# Altium PCB DC116A_PCB.PcbDoc (part 4 of 5)
Units mil, origin at the board's own origin, x right, y up, seen from the top; angles counter-clockwise.
Board outline 3300 x 2000 mil, 4 copper layers (Top Layer, GND1, PWR SPLIT PLANE, Bottom Layer), stack 58.64 mil thick; 315 components, 191 nets, 877 pads, 364 vias.
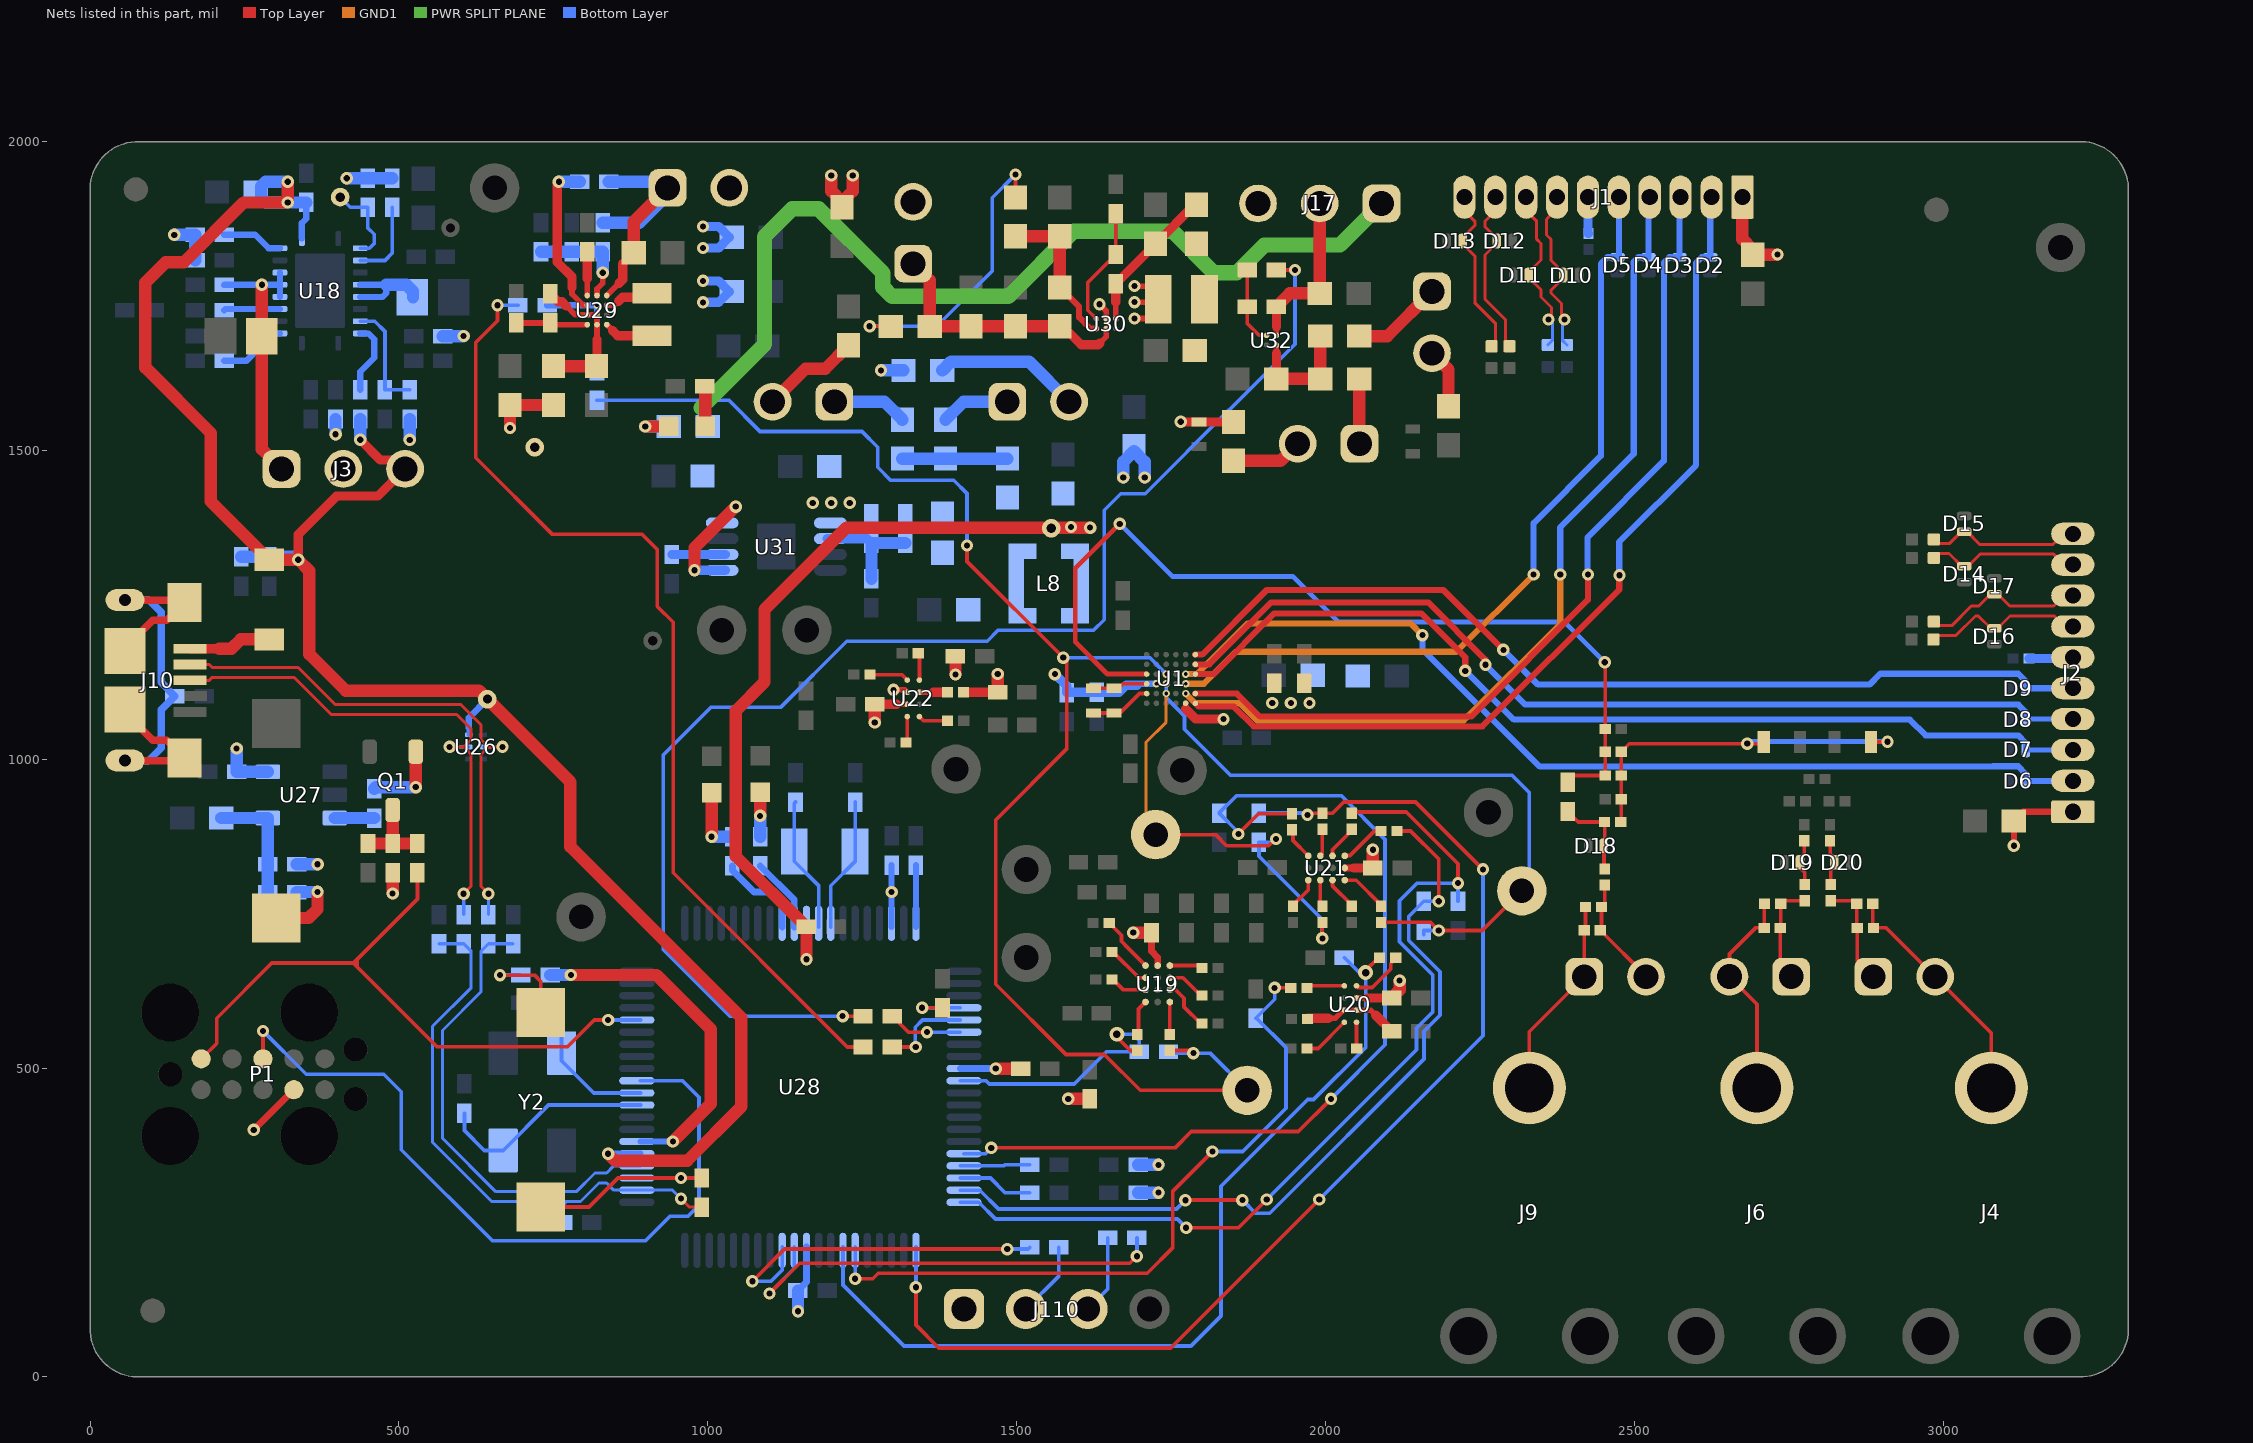
[diagram p5: the nets of this part, all layers, seen from the top]

## Via types
v1: diameter 20, hole 10, Top Layer to Bottom Layer, tented both sides, 316 vias
v2: diameter 19.68, hole 7.87, Top Layer to Bottom Layer, 13 vias
v3: diameter 12, hole 6, Top Layer to GND1, tented both sides, 10 vias
v4: diameter 12, hole 6, Top Layer to Bottom Layer, tented both sides, 8 vias
v5: diameter 30, hole 15, Top Layer to Bottom Layer, tented bottom, 5 vias
v6: diameter 12, hole 6, Top Layer to Bottom Layer, tented bottom, 5 vias
v7: diameter 19.68, hole 7.87, Top Layer to Bottom Layer, tented both sides, 4 vias
v8: diameter 24, hole 12, Top Layer to Bottom Layer, tented both sides, 3 vias

## Nets (pads, with @x,y where several pads share a name; then routed paths per layer and width w, separated by ;. In a path a pad name is that pad's centre, name@x,y a point inside that pad or via, vN(x,y) a via of type N, cw(c..) or ccw(c..) an arc to the next point about the centre after c; other vN are vias at no path point) (continued)
LDO_EN: R97.1 R131.1 | length 2235.2
  Top Layer w6: v1(1218.34,584.17) R97.1@1251.38,584.17 ; R131.1@1920.59,1792.05 v1(1950.79,1792.05)
  Bottom Layer w6: v1(1218.34,584.17) 1035.83,584.17 928.16,691.84 928.16,1006.87 1005.68,1084.39 1118.69,1084.39 1225.2,1190.89 1452.36,1190.89 1470.49,1209.03 1625.03,1209.03 1642,1226 1642,1403.2 1668.76,1429.96 1708.11,1429.96 1843.16,1565.01 1844.08,1565.01 1950.79,1671.72 v1(1950.79,1792.05)
MSP_AVCC: C49.2 C69.1 L8.2 R122.1 U28.11 | length 1267.4
  Top Layer w20: v1(1159.84,676.09) C49.2@1159.84,728.54 1045.38,843 1045.38,1078.33 1092,1124.94 1092,1242.38 1224.62,1375 v1(1619,1375)
  Bottom Layer w10: v1(1159.84,676.09) U28.11@1159.84,728.54
  other v1: 1588,1376
  other v5: 1556,1374
MSP_DVCC: C20.2 C22.1 C24.2 C26.2 C43.2 C50.2 C51.2 C66.1 C67.1 J17.1 J110.1 P1.4 R17.1 R18.1 R19.1 R21.1 R22.1 R23.1 R25.1 R83.2 R91.2 R94.2 R98.2 R99.2 R121.1 R123.2 U19.A2 U20.B2 U21.A2 U22.B2 U27.5 U28.18 U28.50 U31.1 | length 2660.4
  Top Layer w9.05: 1305.53,1088.82 U22.B2@1323.02,1088.82 ; U20.B2@2050.28,613.53 2067.59,613.53
  Top Layer w10.83: C20.2@1718.37,719.39 1718.37,689.37 1728.4,679.34 U19.A2@1728.4,666.01 ; U21.A2@2031.18,823.97 2045.65,823.97
  Top Layer w11: v1(265,400) P1.4@330,465
  Top Layer w15: C26.2@1270.44,1088.82 1305.53,1088.82 ; 2045.65,823.97 C24.2@2076.82,823.97 ; 2067.59,613.53 C22.1@2107.26,613.53
  Top Layer w20: v1@490,782.79 R83.2@490,816.38 ; v1(1270.44,1059.42) C26.2@1270.44,1088.82 ; v1(1583.54,450.17) R94.2@1618.54,450.17 ; v1(1688.97,719.39) C20.2@1718.37,719.39 ; C24.2@2076.82,823.97 v1(2076.82,853.36) ; C22.1@2107.26,613.53 2120.08,626.35 v1(2120.08,641.68)
  PWR SPLIT PLANE w25: 989.62,1569.27 1091.86,1671.5 1091.86,1846.01 1136.7,1890.85 1179.7,1890.85 1283.5,1787.05 1283.5,1764.11 1298.36,1749.25 1486.75,1749.25 1592.57,1855.07 1752.09,1855.07 1819.7,1787.46 1856.13,1787.46 1901.18,1832.51 2023.61,1832.51 J17.1@2090.89,1899.79
  Bottom Layer w10: U28.18@1297.64,728.54 v1(1297.64,785) C50.2@1297.64,828.54
  Bottom Layer w11: C51.2@1146.06,140 1159.84,153.78 U28.50@1159.84,210.83
  Bottom Layer w20: v1(136.41,1848.9) 136.57,1849.06 R19.1@170.16,1849.06 R17.1@170.16,1807.87 ; v1@237.5,1017.33 C43.2@237.5,979.65 U27.5@287.87,979.65 ; R91.2@334.74,829.84 v1@368.33,829.84 ; v1@397.4,1526.06 R23.1@397.4,1550.81 ; v1@415.81,1940.81 R22.1@449.4,1940.81 R21.1@489.4,1940.81 ; v1@517.4,1517.22 R18.1@517.4,1550.81 ; R25.1@571.02,1685 v1@604.62,1685 ; v1@1146.06,106.41 C51.2@1146.06,140 ; R98.2@1696.62,298.35 v1(1729.62,298.35) ; R99.2@1696.62,343.35 v1(1729.62,343.35)
  other v1: 1146.22,106.25 489.84,782.63 368.49,830 237.34,1017.33 1170,1415 1200,1415 1230,1415 517.56,1517.06 397.56,1526.06 604.77,1685.16 415.65,1940.65
MSP_USB_D_N: C38.1 R86.1 U28.64 | length 759.5
  Bottom Layer w5: C38.1@685,701.38 R86.1@645,701.38 633,689.38 633,623.37 570.51,560.88 570.51,386.49 657,300 787.37,300 817.42,330.05 836.32,330.05 848,341.73 U28.64@891.14,341.73
MSP_USB_D_P: C39.1 R85.1 R87.1 R89.1 U28.62 | length 949.8
  Top Layer w4.9: v1(956.65,288.74) 970.59,274.8 R85.1@990.4,274.8
  Bottom Layer w5: C39.1@565,701.38 R87.1@605,701.38 617,689.38 617,630 554.51,567.51 554.51,379.87 650.37,284 765.74,284 ; 758.58,283.93 765,277.5 ; R89.1@765,250 765,277.5 ; v1(956.65,288.74) 943.03,302.36 848,302.36 836.32,314.05 824.05,314.05 794,284 771.96,284 ; 765,277.5 765.06,277.44 765.41,277.44 771.96,284 ; 765,277.5 765,283.26 765.74,284 ; 765.74,284 771.96,284
MSP_USB_N: J10.2 R86.2 U26.2 | length 886.8
  Top Layer w4.9: J10.2@162.4,1153.39 193,1153.39 197.8,1148.6 336.87,1148.6 396.98,1088.48 600.27,1088.48 633,1055.75 633,1032 645,1020 ; v1(644.84,782.37) 632.84,794.37 632.84,1007.84 645,1020 ; v1(667.8,1020) 645,1020
  Bottom Layer w5: U26.2@636.81,1020 v1(667.8,1020) ; R86.2@645,748.62 v1@645,782.21
MSP_USB_P: J10.3 R87.2 U26.5 | length 889.9
  Top Layer w4.9: v1(582.2,1020) 605,1020 ; v1(604.84,782.37) 616.84,794.37 616.84,1008.16 605,1020 ; 193,1127.8 197.8,1132.6 330.24,1132.6 390.36,1072.48 593.64,1072.48 617,1049.12 617,1032 605,1020 ; 193,1127.8 162.82,1127.81 193,1127.8
  Bottom Layer w5: v1(582.2,1020) U26.5@613.19,1020 ; R87.2@605,748.62 v1@605,782.21
NetC2_1: C2.1 C27.1 U1.E1 | length 99.3
  Top Layer w6: C27.1@1624.76,1075 C2.1@1657.76,1075 ; C2.1@1657.76,1074 1666.47,1074 1698.85,1106.38 U1.E1@1710.63,1106.38
NetC2_2: C2.2 C27.2 U1.D1 | length 95.7
  Top Layer w6: C27.2@1624.76,1115 1656.76,1115 C2.2@1657.26,1114.5 ; C2.2@1657.76,1114 C2.2@1664.13,1114 ; C2.2@1657.76,1115 1663.13,1115 C2.2@1664.13,1114 ; U1.D1@1710.63,1122.13 1672.26,1122.13 C2.2@1664.13,1114
NetC13_1: C13.1 C14.2 J3.1 U18.15 U18.16 U18.17 | length 440.8
  Top Layer w20: v1(278.15,1768.03) C13.1@278.15,1684.71 278.15,1501.85 J3.1@310,1470
  Bottom Layer w10: C14.2@217.4,1767.87 217.73,1768.21 U18.16@307.47,1768.21 ; U18.15@307.47,1748.52 U18.16@307.47,1768.21 ; U18.17@307.47,1787.89 U18.16@307.47,1768.21
NetC30_1: C30.1 J5.1 R3.1 R5.2 | length 173.2
  Top Layer w6: R3.1@2818,771.02 2854.96,771.02 R5.2@2860.01,765.97 2860.01,728.02 C30.1@2861.02,727.02 2861.02,674 J5.1@2887,648.02
NetC30_2: C30.2 J4.1 J5.2 R5.1 | length 390
  Top Layer w6: R5.1@2885.99,765.97 2885.99,728.02 C30.2@2887,727.02 2908,727.02 J5.2@2987,648.02 3078,557.02 J4.1@3078,467.79
NetC33_1: C33.1 J7.1 R8.1 R12.2 | length 166.6
  Top Layer w6: J7.1@2754,648.05 2736.4,665.65 R12.2@2736.4,727.02 2736.98,727.6 C33.1@2736.98,765.97 2742.03,771.02 R8.1@2776,771.02
NetC33_2: C33.2 J6.1 J7.2 R12.1 | length 348.5
  Top Layer w6: J6.1@2698.5,467.79 2698.5,603.54 J7.2@2654,648.05 2654,684.74 2696.27,727.02 R12.1@2710.41,727.02 2710.41,765.38 C33.2@2711,765.97
NetC35_2: C35.2 C77.1 R6.1 R7.2 R70.2 R71.1 | length 606.9
  Top Layer w6: R70.2@2477.98,898.25 2478.87,899.13 C77.1@2478.87,935.25 2478.93,935.31 C35.2@2478.93,973.65 R71.1@2478.93,1012.25 2491.92,1025.24 v1(2683,1025.24) 2706.71,1025.24 R7.2@2709.47,1028 ; R6.1@2883.06,1028 2909.63,1028 v1(2910,1028.37)
  Bottom Layer w8: v1(2683,1025.24) 2686.14,1028.37 v1(2910,1028.37)
NetC36_1: C36.1 J8.2 R72.2 R73.1 | length 182.1
  Top Layer w6: R73.1@2452,796.54 2452,766.01 R72.2@2446.99,761 2446.99,725 C36.1@2444.99,723 2519,648.99 J8.2@2519,647.98
NetC36_2: C36.2 J8.1 J9.1 R72.1 | length 336
  Top Layer w6: J9.1@2330,467.79 2330,558.98 J8.1@2419,647.98 C36.2@2419.01,723 2421.01,725 R72.1@2421.01,761
  Top Layer w8.5: J9.1@2326.38,460.2 J9.1@2330,456.57
NetC37_1: C37.1 Q1.3 R83.1 R84.1 | length 134.1
  Top Layer w20: C37.1@450,863.62 R83.1@490,863.62 ; Q1.3@490,917.76 R83.1@490,863.62 ; R84.1@530,863.62 R83.1@490,863.62
NetC42_1: C42.1 R91.1 R92.2 U27.4 | length 195.5
  Bottom Layer w20: C42.1@212.5,904.84 U27.4@287.87,904.84 287.87,830.21 R91.1@287.5,829.84 R92.2@287.5,784.84
NetC47_1: C47.1 U28.20 | length 100
  Bottom Layer w10: U28.20@1337.01,728.54 C47.1@1337.01,828.54
NetC53_1: C53.1 R106.1 R108.1 U29.A2 U29.B2 U29.B3 | length 243.1
  Top Layer w9: 771.12,1733.59 785.45,1719.25 U29.B3@805,1719.25 U29.B2@820.75,1719.25 U29.A2@820.75,1703.5 820.75,1679.55
  Top Layer w15: R108.1@745,1753.62 757.98,1740.64 764.07,1740.64 771.12,1733.59 ; C53.1@820,1636.5 820.75,1637.24 820.75,1679.55
  Top Layer w20: R106.1@750,1636.5 C53.1@820,1636.5
NetC54_1: C54.1 J12.1 R109.2 R110.2 U29.D1 | length 448.8
  Top Layer w9: U29.D1@836.5,1750.75 856.37,1770.62
  Top Layer w15: 856.37,1770.62 862.26,1776.51 862.26,1802.26 C54.1@880,1820
  Top Layer w20: C54.1@880,1820 880,1870 J12.1@935,1925
  Bottom Layer w20: R109.2@830,1868.62 889.36,1868.62 935,1914.26 J12.1@935,1925 925,1935 R110.2@840,1935
NetC58_1: C58.1 R107.2 R111.2 U30.A1 | length 240.7
  Top Layer w9.05: U30.A1@1660.67,1713.03 1660.67,1740.12
  Top Layer w15: 1660.67,1740.12 R111.2@1660.67,1769.88 1725.17,1834.38 C58.1@1725.17,1834.54 1788.16,1897.53 R107.2@1791.58,1897.53
NetC59_1: C59.1 C60.1 C63.1 J13.1 R112.2 U30.B2 | length 424.1
  Top Layer w9.05: 1634.52,1673.46 1644.92,1683.86 U30.B2@1644.92,1697.28
  Top Layer w15: C63.1@1574.95,1700.84 1604.59,1671.2 1632.27,1671.2 1634.52,1673.46
  Top Layer w20: J13.1@1332.51,1802.29 1359.27,1775.53 R112.2@1359.27,1700.84 C60.1@1426.51,1700.84 C59.1@1498.23,1700.84 C63.1@1569.95,1700.84
NetC62_1: C62.1 R109.1 R114.2 U29.D2 | length 174.4
  Top Layer w9: U29.D2@820.75,1750.75 820.75,1761.38 830.16,1770.79 v1(830.16,1787.63)
  Bottom Layer w20: R114.2@730,1821.38 C62.1@780,1821.38 R109.1@830,1821.38 v1@830,1787.79
NetC63_2: C63.2 R117.1 R119.2 U30.C2 | length 251
  Top Layer w10: C63.2@1569.95,1763.84 1601.3,1732.49 1601.3,1715.44 1619.45,1697.28 U30.C2@1629.17,1697.28
  Top Layer w20: R117.1@1498.23,1846.5 R119.2@1569.89,1846.51 C63.2@1569.89,1763.9
NetC64_1: C64.1 U29.D3 | length 70.6
  Top Layer w9: U29.D3@805,1750.75 805,1778.13
  Top Layer w15: 805,1778.13 C64.1@805,1821.38
NetC66_2: C66.2 R123.1 R126.1 U31.2 | length 187
  Bottom Layer w15: U31.2@1193.68,1357.04 1257.96,1357.04 C66.2@1265,1350
  Bottom Layer w20: R126.1@1265,1292.24 C66.2@1265,1350 R123.1@1320,1350
NetC68_1: C68.1 L8.1 R121.2
NetC72_1: C72.1 U31.6 | length 86.3
  Bottom Layer w15: C72.1@942,1331.45 U31.6@1028.32,1331.45
NetC74_1: C74.1 J17.2 R130.2 U32.A2 | length 271.1
  Top Layer w9.05: U32.A2@1920.59,1686.28 1920.59,1700.03
  Top Layer w15: 1920.59,1700.03 R130.2@1920.59,1732.56
  Top Layer w20: R130.2@1920.59,1732.56 1942.3,1754.28 C74.1@1990.89,1754.28 J17.2@1990.89,1899.79
NetC75_1: C75.1 R128.1 R129.1 U32.B2 | length 195
  Top Layer w9.05: 1920.59,1657.43 U32.B2@1920.59,1670.53
  Top Layer w15: C75.1@1920.59,1615.7 1920.59,1657.43
  Top Layer w20: C75.1@1920.59,1615.7 R129.1@1991.51,1615.7 ; R129.1@1991.57,1615.63 R128.1@1991.57,1684.87
NetD18_1: D18.1 R70.1 R73.2 R74.1 | length 143.8
  Top Layer w6: R74.1@2392,915.38 2409.13,898.25 R70.1@2452,898.25 2452,861.19 D18.1@2450.8,859.99 2450.8,823.73 R73.2@2452,822.52
NetD19_1: D19.1 R8.2 R10.1 | length 77
  Top Layer w6: R10.1@2775,868 2775,846.71 2768.26,839.97 D19.1@2768.26,832.93 2768.26,824.28 2776,816.55 R8.2@2776,797
NetD20_1: D20.1 R3.2 R4.1 | length 77.5
  Top Layer w6: R3.2@2817,798 R3.2@2818,797 2818,820.3 2823.7,826 D20.1@2823.7,832.93 2823.7,840.01 2817,846.71 R4.1@2817,868
NetJ1_6: J1.6 R1.1 | length 59.4
  Bottom Layer w15: J1.6@2425,1910 2425,1851.99 R1.1@2426,1850.99
NetJ2_6: J2.6 R2.1 | length 71.8
  Bottom Layer w15: R2.1@3138.99,1163 3208,1163 J2.6@3210,1165
NetJ10_6: J10.6 J10.7 J10.8 J10.9 J10.10 J10.11 R88.2 | length 831.3
  Top Layer w12: J10.7@56.67,997.88 149.19,997.88 J10.9@153.12,1001.82 124.25,1030.69 101.83,1030.69 56.67,1075.85 J10.11@56.67,1080.56 ; J10.10@56.67,1175.05 56.67,1179.75 101.83,1224.92 124.25,1224.92 J10.8@153.12,1253.79 149.19,1257.72 J10.6@56.67,1257.72
  Bottom Layer w12: J10.7@56.67,997.88 94.67,997.88 115,1018.21 115,1079.83 R88.2@137.38,1102.21 115,1124.59 115,1237.8 95.08,1257.72 J10.6@56.67,1257.72
NetJ11_1: J11.1 R129.2 | length 104.3
  Top Layer w20: J11.1@2054.57,1511.29 R129.2@2054.57,1615.63
NetJ11_2: J11.2 L11.1 | length 115.5
  Top Layer w20: L11.1@1851.03,1483.02 1927.15,1483.02 J11.2@1954.99,1510.87
NetJ14_1: J14.1 R120.2 | length 122
  Bottom Layer w20: J14.1@1205,1578.74 1285.98,1578.74 R120.2@1315,1549.72
NetJ14_2: J14.2 L7.1 | length 161
  Top Layer w20: J14.2@1105,1578.74 1158.35,1632.09 1190.15,1632.09 L7.1@1228.15,1670.09
NetJ15_1: J15.1 R125.2 | length 112
  Bottom Layer w20: R125.2@1385,1549.72 1414.02,1578.74 J15.1@1485,1578.74
NetJ15_2: J15.2 L9.1 | length 238
  Bottom Layer w20: L9.1@1379.86,1629.49 1394.11,1643.74 1520,1643.74 J15.2@1585,1578.74
NetJ16_1: J16.1 R128.2 | length 148.1
  Top Layer w20: R128.2@2054.57,1684.87 2100.12,1684.87 J16.1@2172.6,1757.35
NetJ16_2: J16.2 L10.1 | length 96.9
  Top Layer w20: J16.2@2172.6,1657.35 2199.11,1630.84 2199.11,1571.61 L10.1@2199,1571.5
NetJ110_2: J110.2 R103.2 | length 121.9
  Bottom Layer w6: J110.2@1515,110 1568.46,163.46 R103.2@1568.46,209.73
NetJ110_3: J110.3 R102.2 | length 129
  Bottom Layer w6: J110.3@1615,110 1647.52,142.52 R102.2@1647.52,225.54
NetL5_1: L5.1 U29.A1 | length 80.9
  Top Layer w9: U29.A1@836.5,1703.5 846.34,1693.66
  Top Layer w15: 846.34,1693.66 854.45,1685.55 L5.1@910,1685.55
NetL5_2: L5.2 U29.C1 | length 81.6
  Top Layer w9: U29.C1@836.5,1735 849.13,1735 855.52,1741.4
  Top Layer w15: 855.52,1741.4 861.94,1747.82 903.37,1747.82 L5.2@910,1754.45
NetL6_2: L6.2 U30.B1 | length 188.1
  Top Layer w9.05: v1(1634.3,1736.64) 1644.92,1726.02 U30.B1@1644.92,1713.03 ; v1(1690.92,1713.53) 1720.49,1713.53 1729.53,1722.56 L6.2@1729.53,1744.51 ; v1(1690.92,1739.97) 1724.99,1739.97 L6.2@1729.53,1744.51 ; v1(1690.92,1766.02) 1721.34,1766.02 1729.53,1757.84 L6.2@1729.53,1744.51
NetLED1_1: LED1.1 R104.1 | length 104.6
  Top Layer w20: v1(1006.25,874.46) LED1.1@1006.25,945.47
  Bottom Layer w20: v1@1006.41,874.62 R104.1@1040,874.62
NetLED2_1: LED2.1 R105.1 | length 71.6
  Top Layer w20: v1(1084.84,908.37) LED2.1@1084.84,946.36
  Bottom Layer w20: R105.1@1085,874.62 v1@1085,908.21
NetLED3_2: LED3.2 R127.1 | length 65.4
  Top Layer w20: R127.1@995,1603.74 996.06,1602.68 LED3.2@996.06,1538.74
NetQ1_1: Q1.1 R90.2 | length 125.9
  Top Layer w20: v1(527.4,954.87) Q1.1@527.4,1012.24
  Bottom Layer w20: R90.2@460,952.09 462.79,954.87 v1(527.4,954.87)
NetR13_1: R13.1 U18.14 | length 90.8
  Bottom Layer w10: R13.1@217.4,1727 219.24,1728.84 U18.14@307.47,1728.84
NetR27_2: R27.2 U19.A3 | length 51.5
  Top Layer w6: U19.A3@1748.08,666.01 1794.04,666.01 R27.2@1797.97,662.08
NetR28_1: R28.1 U19.A1 | length 93.4
  Top Layer w6: R28.1@1649.87,734.88 1650.12,734.88 1669.97,715.03 1669.97,705.22 1676.27,698.92 1676.27,698.45 U19.A1@1708.71,666.01
NetR29_2: R29.2 U19.B3 | length 61.8
  Top Layer w6: U19.B3@1748.08,646.33 1769.22,646.33 R29.2@1797.97,617.57
NetR30_1: R30.1 U19.B1 | length 69.8
  Top Layer w6: R30.1@1656.25,688.15 1698.07,646.33 U19.B1@1708.71,646.33
NetR31_2: R31.2 U19.C3 | length 80.7
  Top Layer w6: U19.C3@1748.08,626.64 1757.74,626.64 1771.17,613.22 1771.17,599.08 R31.2@1797.98,572.26
NetR32_1: R32.1 U19.C1 | length 59.4
  Top Layer w6: R32.1@1656.25,643.4 1673,626.64 U19.C1@1708.71,626.64
NetR33_2: R33.2 U19.D3 | length 50.5
  Top Layer w6: R33.2@1748.08,556.48 U19.D3@1748.08,606.96
NetR34_1: R34.1 U19.D1 | length 57.8
  Top Layer w6: R34.1@1697.36,553.87 1697.36,595.6 U19.D1@1708.71,606.96
NetR37_1: R37.1 U20.A2 | length 91.5
  Top Layer w6: U20.A2@2050.28,633.22 2052.98,630.52 2075.93,630.52 2105.74,660.33 2105.74,668.9 R37.1@2115.64,678.79
NetR40_2: R40.2 U20.A1 | length 60
  Top Layer w6: R40.2@1971.93,629.88 1975.27,633.22 U20.A1@2030.59,633.22
NetR42_2: R42.2 R43.2 U20.C1 U20.C2 | length 154.8
  Top Layer w9.05: 2004.54,580.83 2015.97,580.83 2028.99,593.85 U20.C1@2030.59,593.85 U20.C2@2050.28,593.85 2073.2,593.85 2081.07,585.97
  Top Layer w15: R43.2@1971.93,580.83 2004.54,580.83 ; 2081.07,585.97 R42.2@2107.26,559.79
NetR44_2: R44.2 U20.D1 | length 76.2
  Top Layer w6: R44.2@1971.93,531.78 1988.21,531.78 U20.D1@2030.59,574.16
NetR45_1: R45.1 U20.D2 | length 43.4
  Top Layer w6: U20.D2@2050.28,574.16 2050.28,534.26 R45.1@2052.77,531.78
NetR46_2: R46.2 U21.A3 | length 75.7
  Top Layer w6: U21.A3@2031.18,804.28 2049.7,804.28 R46.2@2090.1,763.89
NetR47_1: R47.1 U21.A1 | length 76
  Top Layer w6: U21.A1@2031.18,843.65 2031.18,844.2 2039.75,844.2 2079.55,884 R47.1@2090.01,884 ; R47.1@2090.01,884.62 R47.1@2090.1,884.62
NetR48_2: R48.2 U21.B3 | length 53.3
  Top Layer w6: U21.B3@2011.49,804.28 2011.49,794.97 R48.2@2042.58,763.89
NetR49_1: R49.1 U21.B1 | length 53.8
  Top Layer w6: U21.B1@2011.49,843.65 2011.49,853.54 R49.1@2042.58,884.62
NetR50_2: R50.2 U21.C3 | length 41.7
  Top Layer w6: U21.C3@1991.81,804.28 1991.81,767.13 R50.2@1995.05,763.89
NetR51_1: R51.1 U21.C1 | length 42.3
  Top Layer w6: U21.C1@1991.81,843.65 1995.05,846.9 R51.1@1995.05,884.62
NetR52_2: R52.2 U21.D3 | length 50.6
  Top Layer w6: R52.2@1947.53,763.89 1972.12,788.48 U21.D3@1972.12,804.28
NetR53_1: R53.1 U21.D1 | length 51.2
  Top Layer w6: R53.1@1947.53,884.62 1947.53,868.25 U21.D1@1972.12,843.65
NetR62_1: R62.1 U22.A2 | length 42.2
  Top Layer w6: R62.1@1323.02,1026.96 U22.A2@1323.02,1069.13
NetR63_2: R63.2 U22.D2 | length 62.2
  Top Layer w6: R63.2@1264.44,1136.99 1314.22,1136.99 U22.D2@1323.02,1128.19
NetR64_1: R64.1 U22.A1 | length 46.4
  Top Layer w6: U22.A1@1342.71,1069.13 1349.42,1062.43 R64.1@1386.38,1062.43
NetR65_2: R65.2 U22.D1 | length 43.3
  Top Layer w6: U22.D1@1342.71,1128.19 R65.2@1342.71,1171.52
NetR66_1: R66.1 U22.C1 | length 43.6
  Top Layer w9.05: U22.C1@1342.71,1108.5 1365.39,1108.5
  Top Layer w15: 1365.39,1108.5 R66.1@1386.35,1108.5
NetR82_2: R82.2 S1.2 | length 154
  Top Layer w6: v1(663.77,650.52) 719.48,650.52 729.76,640.24 S1.2@729.76,590.06
  Bottom Layer w6: v1@663.93,650.68 R82.2@697.52,650.68
NetR90_1: R90.1 U27.3 | length 63.9
  Bottom Layer w20: U27.3@396.13,904.84 R90.1@460,904.84
NetR92_1: R92.1 S2.1 | length 134.4
  Top Layer w20: S2.1@301.36,742.9 353.93,742.9 368.24,757.21 v1(368.24,785.27)
  Bottom Layer w20: R92.1@334.74,784.84 v1(368.24,785.27)
NetR100_1: R100.1 U28.37 | length 113.2
  Bottom Layer w6: U28.37@1408.86,341.73 1479.73,341.73 1481.35,343.35 R100.1@1521.38,343.35
NetR101_1: R101.1 U28.38 | length 122.3
  Bottom Layer w6: U28.38@1408.86,322.05 1457.65,322.05 1481.35,298.35 R101.1@1521.38,298.35
NetR104_2: R104.2 U28.9 | length 146.8
  Bottom Layer w11: R104.2@1040,827.38 1040,820 1075,785 1100,785 1120.47,764.53 U28.9@1120.47,728.54
NetR105_2: R105.2 U28.10 | length 121.7
  Bottom Layer w11: R105.2@1085,827.38 1140.16,772.22 U28.10@1140.16,728.54
NetR108_2: R108.2 R113.2 U29.A3 | length 116.2
  Top Layer w9: R108.2@745,1706.38 747.87,1703.5 U29.A3@805,1703.5
  Top Layer w10: R113.2@690,1706.38 R108.2@745,1706.38
NetR110_1: R110.1 U29.C3 | length 258.6
  Top Layer w9: 780.21,1763.72 780.21,1753.15 798.36,1735 U29.C3@805,1735
  Top Layer w15: v1(759.01,1934.84) 756.34,1932.18 756.34,1804.82 780.21,1780.95 780.21,1763.72
  Bottom Layer w20: v1@759.17,1935 R110.1@792.76,1935
NetR111_1: R111.1 R115.2 U30.C1 | length 194.8
  Top Layer w6: U30.C1@1629.17,1713.03 1615.3,1726.91 1615.3,1771.75 R111.1@1660.67,1817.12 R115.2@1660.67,1883.28
NetR112_1: R112.1 R117.2 | length 483.8
  Top Layer w6: v1(1262.08,1700.84) R112.1@1296.28,1700.84 ; R117.2@1498.23,1909.5 v1(1498.23,1946.7)
  Bottom Layer w6: v1(1262.08,1700.84) 1370.9,1700.84 1460.47,1790.41 1460.47,1908.93 v1(1498.23,1946.7) v1@1503.23,1946.7
NetR116_2: R116.2 R118.2 U29.C2 | length 187.1
  Bottom Layer w10: R118.2@740,1735 v6(820.75,1735) R116.2@820.75,1628.62
NetR120_1: R120.1 R122.2 R125.1 | length 170
  Bottom Layer w20: R120.1@1315,1486.73 R125.1@1385,1486.73 R122.2@1485,1486.73
NetR130_1: R130.1 R131.2 U32.A1 | length 126
  Top Layer w6: R131.2@1873.34,1792.05 R130.1@1873.34,1732.56 1873.34,1705.55 1892.61,1686.28 U32.A1@1904.84,1686.28
P1.3: R93.2 U28.24 | length 94.9
  Top Layer w6: v1(1347,597.64) R93.2@1380,597.64
  Bottom Layer w6: v1(1347,597.64) U28.24@1408.86,597.64
P1.4: R95.2 U28.25 | length 148
  Top Layer w6: R95.2@1298.62,534.17 v1(1336.62,534.18)
  Bottom Layer w6: v1(1336.62,534.18) 1336,534.8 1336,566.14 1347.82,577.95 U28.25@1408.86,577.95
P1.5: R97.2 U28.26 | length 121
  Top Layer w6: R97.2@1298.62,584.17 1324.53,558.27 v1(1355,558.27)
  Bottom Layer w6: v1(1355,558.27) U28.26@1408.86,558.27
P2.0: R96.2 U28.29 | length 97.5
  Top Layer w20: v1(1466.35,499.21) R96.2@1506.38,499.21
  Bottom Layer w11: U28.29@1408.86,499.21 v1(1466.35,499.21)
PACK_P: C18.1 U18.5 U18.6 | length 157.4
  Bottom Layer w10: U18.6@437.39,1748.52 473.52,1748.52 479.66,1754.66 479.66,1768.03 U18.5@437.39,1768.03
  Bottom Layer w20: 479.66,1768.03 512.31,1768.03 522.94,1757.4 C18.1@522.94,1748.19
PD1_N: D11.1 J1.8 L12.2 | length 280.6
  Top Layer w4.9: J1.8@2325,1910 2325,1887.98 2342,1870.98 2342,1842 2348.99,1835.01 2348.99,1808.17 2329.24,1788.43 D11.1@2329.24,1783.88 2329.24,1779.62 2348.99,1759.87 2348.99,1748.19 2366,1731.19 2366,1716.99 v1(2361.01,1712)
  Bottom Layer w5: L12.2@2360,1670.56 2367.5,1678.06 2367.5,1705.51 v1(2361.01,1712)
PD1_P: D10.1 J1.7 L14.2 | length 279.5
  Top Layer w4.9: J1.7@2375,1910 2375,1891 2358,1874 2358,1848.63 2364.99,1841.64 2364.99,1807.64 2384.9,1787.73 D10.1@2384.9,1783.88 2384.9,1779.28 2364.99,1759.37 2364.99,1754.82 2382,1737.81 2382,1716.99 v1(2386.99,1712)
  Bottom Layer w5: v1(2386.99,1712) 2383.5,1708.51 2383.5,1678.12 L14.2@2391,1670.62
PD2_N: D13.1 J1.10 L1.2 | length 281.9
  Top Layer w4.9: J1.10@2225,1910 2225,1887.3 2242.3,1870 2242.3,1864.79 2221.95,1844.45 D13.1@2221.95,1839 2221.95,1834.21 2242.3,1813.87 2242.3,1738.23 2275.5,1705.03 2275.5,1675.09 L1.2@2269,1668.59
PD2_P: D12.1 J1.9 L3.2 | length 280.7
  Top Layer w4.9: J1.9@2275,1910 2275,1887.7 2258.3,1871 2258.3,1862.08 2277.54,1842.83 D12.1@2277.54,1839 2277.54,1835.63 2258.3,1816.38 2258.3,1744.86 2291.5,1711.65 2291.5,1675.09 L3.2@2298,1668.59
PD3_N: D15.1 J2.10 L2.2 | length 251.4
  Top Layer w4.9: L2.2@2984.89,1356 2991.89,1349 3010,1349 3029.2,1368.2 D15.1@3034,1368.2 3038.81,1368.2 3059.01,1348 3178,1348 3195,1365 J2.10@3210,1365
PD3_P: D14.1 J2.9 L4.2 | length 251.7
  Top Layer w4.9: L4.2@2984.89,1326 2991.89,1333 3009.32,1333 3029.89,1312.43 D14.1@3034,1312.43 3040.12,1312.43 3059.69,1332 3179,1332 3196,1315 J2.9@3210,1315
PD4_N: D17.1 J2.8 L13.2 | length 264.7
  Top Layer w4.9: L13.2@2984.89,1222.75 2991.39,1216.25 3013.94,1216.25 3045.7,1248 3057.76,1248 3077.97,1268.2 3083,1268.2 3087.68,1268.2 3107.89,1248 3179,1248 3196,1265 J2.8@3210,1265
PD4_P: D16.1 J2.7 L15.2 | length 266.1
  Top Layer w4.9: L15.2@2984.29,1193.75 2990.79,1200.25 3020.57,1200.25 3052.32,1232 3057,1232 3078.18,1210.82 3083,1210.82 3087.06,1210.82 3108.24,1232 3180,1232 3197,1215 J2.7@3210,1215
PFM/PWM_CTRL: R95.1 R118.1 | length 1607.9
  Top Layer w6: v1(659.76,1735) 659.76,1709.97 624.54,1674.75 624.54,1488.25 748.77,1364.02 893.86,1364.02 918.27,1339.61 918.27,1247.47 944,1221.74 944,816.2 1226.03,534.17 R95.1@1251.38,534.17
  Bottom Layer w6: v1(659.76,1735) R118.1@692.76,1735
POW_CE: R15.2 U18.9 | length 117.8
  Bottom Layer w10: R15.2@437.4,1598.05 437.4,1627.4 460,1650 460,1680 450.53,1689.47 U18.9@437.39,1689.47
PROG_OUT1: R33.1 R41.2 R116.1 TP7.1 U1.C3 | length 2438.3
  Top Layer w6: v1(1419.74,1346.12) 1419.74,1320.26 v1(1575.47,1164.53) 1580.99,1159.01 1580.99,1016.4 1466.38,901.78 1466.38,635.85 1580.07,522.16 1642.06,522.16 1700.22,464 TP7.1@1873.34,464 ; R33.1@1748.08,528.52 1781.88,528.52 v1(1786.18,524.23)
  Bottom Layer w6: R116.1@820.75,1581.38 1033.93,1581.38 1084.67,1530.64 1249.66,1530.64 1275.21,1505.09 1275.21,1472.58 1296,1451.8 1398.2,1451.8 1419.74,1430.26 v1(1419.74,1346.12) ; v1(1575.47,1164.53) 1715.41,1164.53 v4(1742.13,1137.87) ; R41.2@1745.94,526.56 1748.27,524.23 v1(1786.18,524.23) 1813.12,524.23 TP7.1@1873.34,464
PROG_OUT1_P2.1: R34.2 R41.1 U28.30 | length 422.1
  Top Layer w6: v8(1662.34,554.75) 1662.34,550.11 1683.93,528.52 R34.2@1695.36,528.52 ; R34.2@1696.47,529.64 1697.36,528.75 R34.2@1697.36,526.56
  Bottom Layer w6: U28.30@1408.86,479.53 1450.4,479.53 1455.69,474.23 1593.24,474.23 1645.56,526.56 R41.1@1698.7,526.56 1698.7,544.24 1688.19,554.75 v8(1662.34,554.75)
PSEL: R18.2 R20.2 U18.8 | length 181.4
  Bottom Layer w6: U18.8@437.39,1709.15 460.85,1709.15 477.4,1692.6 R20.2@477.4,1598.05 R18.2@517.4,1598.05
PUR: R85.2 S1.1 U28.63 | length 345.7
  Top Layer w6: S1.1@729.76,275.1 807.93,275.1 854.87,322.05 v1(956.65,322.05) R85.2@990.4,322.05
  Bottom Layer w6: U28.63@891.14,322.05 956.49,322.05 v1@956.65,322.21
RLD: C35.1 C78.1 R71.2 R74.2 U1.C1 | length 1485.2
  Top Layer w6: R74.2@2392,962.62 2403.03,973.65 C35.1@2452.95,973.65 R71.2@2452.95,1012.25 2453.01,1012.31 C78.1@2453.01,1049 2453.01,1156.15 v1(2452.16,1157)
  Top Layer w8: v1(1667,1381) 1595,1309 1595,1189.99 1647.12,1137.87 U1.C1@1710.63,1137.87
  Bottom Layer w8: v1(1667,1381) 1752,1296 1947,1296 2020.52,1222.48 2386.68,1222.48 v1(2452.16,1157)
RX_SUP: C7.1 C8.2 C25.1 C70.1 C76.1 L9.2 L11.2 R66.2 R67.2 U1.D2 U22.C2 | length 546.6
  Top Layer w9.05: v1(1300.67,1112.32) 1319.21,1112.32 U22.C2@1323.02,1108.5
  Top Layer w15: R66.2@1416.27,1108.5 C25.1@1469.52,1108.5 ; v1(1765.68,1546.4) 1766.07,1546.01 L11.2@1851.03,1546.01
  Top Layer w20: v1(1401.03,1137.12) R67.2@1401.03,1166.51 ; C25.1@1469.52,1108.5 v1(1469.52,1137.9)
  Bottom Layer w10: 1695,1120 1697.13,1122.13 v4(1726.38,1122.13)
  Bottom Layer w15: v1(1562,1137.87) 1581,1118.87 C8.2@1581,1108.01 1581.61,1108.62 C7.1@1630,1108.62 1665.94,1108.62 1677.32,1120 1695,1120
  Bottom Layer w20: v1(1280.41,1629.49) L9.2@1316.87,1629.49 ; v1(1672.65,1456.1) 1672.65,1481.39 1690,1498.74 1707.35,1481.39 v1(1707.35,1456.1)
SBWTCLK: P1.8 U28.71 | length 1250.9
  Top Layer w6: P1.8@280,515 v1(280,560)
  Bottom Layer w6: v1(280,560) 350,490 475.55,490 504,461.55 504,368 651.51,220.49 899.18,220.49 938.69,260 968,260 986,278 986,452.66 959.13,479.53 U28.71@891.14,479.53
SBWTDIO: P1.10 R84.2 U28.76 | length 1074.3
  Top Layer w6: P1.10@180,515 205,540 205,580.66 294.34,670 426.27,670 ; R84.2@530,816.38 530,773.73 432.07,675.8 ; v1(838.69,577.95) 816.46,577.95 772.91,534.41 561.87,534.41 432.07,664.2 ; 426.27,670 432.07,675.8 ; 426.27,670 432.07,664.2 ; 432.07,664.2 432.07,675.8
  Bottom Layer w6: v1(838.69,577.95) U28.76@891.14,577.95
SDOUT: R50.1 R59.1 TP5.1 U1.E3 | length 707.2
  Top Layer w6: TP5.1@1725.17,878 1822,878 1840,860 1908,860 v1@1919.5,871.5 ; v1(1995.05,709.96) R50.1@1995.05,733.97
  GND1 w5: TP5.1@1725.17,878 1709.62,893.55 1709.62,1027.62 1742.13,1060.13 v3(1742.13,1106.38)
  Bottom Layer w6: v1(1920,871) 1920,870.62 1914.97,865.59 R59.1@1892.29,865.59 1892.29,842.85 1995.05,740.1 v1(1995.05,709.96)
SEN: R46.1 R56.1 TP6.1 U1.D3 | length 1141.7
  Top Layer w6: R46.1@2090.1,735.93 2170.21,735.93 v1(2183.37,722.77) 2253.77,722.77 TP6.1@2318,787
  Bottom Layer w6: v4(1742.13,1122.13) 1742.07,1099.82 1771.77,1070.12 1771.77,1048.48 1846.25,974 2302,974 2330,946 2330,799 TP6.1@2318,787 ; R56.1@2159.27,715.7 R56.1@2159.27,722.77 v1(2183.37,722.77)
STAT1: pad.1@405,1910 R22.2 U18.2 | length 140
  Bottom Layer w6: pad.1@405,1910 421.43,1893.57 R22.2@449.4,1893.57 449.4,1860.6 460,1850 460,1835 452.26,1827.26 U18.2@437.39,1827.26
STAT2: R21.2 U18.3 | length 131.1
  Bottom Layer w6: U18.3@437.39,1807.58 477.58,1807.58 489.4,1819.4 R21.2@489.4,1893.57
TS: R14.2 U18.12 | length 108.4
  Bottom Layer w10: R14.2@217.4,1645.21 253.31,1645.21 297.57,1689.47 U18.12@307.47,1689.47
TX1: D2.1 J1.2 U1.F6 | length 1497
  Top Layer w10: U1.F6@1789.37,1090.63 1794.64,1085.36 1851.67,1085.36 1883.99,1053.04 2254.17,1053.04 2475.77,1274.64 v1@2475.77,1295.86
  Bottom Layer w10: v1(2476,1298) 2475.77,1298.23 2475.77,1351.86 2600,1476.09 2600,1714 2600.08,1714.08 2600.08,1803.44 2609.23,1812.59 D2.1@2623,1812.59 2623,1908 J1.2@2625,1910
TX2: D3.1 J1.3 U1.E6 | length 1453.9
  Top Layer w10: U1.E6@1789.37,1106.38 1856.62,1106.38 1893.97,1069.03 2236.03,1069.03 2425,1258 v1(2425,1299)
  Bottom Layer w10: v1(2425,1299) 2424,1300 2424,1358.87 2548,1482.87 2548,1804 2556.59,1812.59 D3.1@2573,1812.59 2573,1908 J1.3@2575,1910
TX3: D4.1 J1.4 U1.E5 | length 1449.7
  GND1 w10: v3(1773.62,1106.38) 1789.37,1090.63 1861.37,1090.63 1889,1063 2224.14,1063 2380,1218.86 v1(2380,1299)
  Bottom Layer w10: v1(2380,1299) 2380,1375.4 2499,1494.4 2499,1805 2506.59,1812.59 D4.1@2523,1812.59 2523,1908 J1.4@2525,1910
TX4: D5.1 J1.5 U1.D5 | length 1314.4
  GND1 w10: v3(1773.62,1122.13) 1803.31,1122.13 1855.19,1174 2212,1174 v1(2337,1299)
  Bottom Layer w10: v1(2337,1299) 2337,1382 2446,1491 2446,1719 2446,1802 2456.59,1812.59 D5.1@2473,1812.59 2475,1814.59 J1.5@2475,1910
TX5: D6.1 J2.2 U1.C5 | length 1596
  GND1 w10: v3(1773.62,1137.87) 1791.99,1137.87 1873.87,1219.76 2138.16,1219.76 v1(2156.91,1201)
  Bottom Layer w10: v1(2156.91,1201) 2156.91,1178.4 2347.32,988 3080,988 3080.55,988.55 3121.45,988.55 3134,976 D6.1@3134,965 J2.2@3210,965
TX6: D7.1 J2.3 U1.C6 | length 1572.1
  Top Layer w10: U1.C6@1789.37,1137.87 1819.06,1137.87 1917.19,1236 2155.36,1236 2226.37,1164.99 v1(2226.37,1143.07)
  Bottom Layer w8: D7.1@3134,1015 J2.3@3210,1015
  Bottom Layer w10: v1(2226.37,1143.07) 2305.15,1064.29 2946,1064.29 2971.74,1038.55 3121.45,1038.55 3134,1026 D7.1@3134,1015
TX7: D8.1 J2.4 U1.B6 | length 1551.9
  Top Layer w10: U1.B6@1789.37,1153.62 1811.8,1153.62 1912.18,1254 2166.37,1254 2259,1161.37 v1(2259,1152.85)
  Bottom Layer w8: D8.1@3134,1065 J2.4@3210,1065
  Bottom Layer w10: v1(2259,1152.85) 2323.3,1088.55 3121.45,1088.55 3134,1076 D8.1@3134,1065
TX8: D9.1 J2.5 U1.A6 | length 1550.8
  Top Layer w10: U1.A6@1789.37,1169.37 1800.24,1169.37 1904.87,1274 2191,1274 v1(2288,1177)
  Bottom Layer w10: v1(2288,1177) 2344,1121 2881,1121 2898.55,1138.55 3121.45,1138.55 3134,1126 D9.1@3134,1115 J2.5@3210,1115
TX_SUP: C1.1 C3.1 C4.2 C5.1 C6.1 C29.1 C55.1 C56.1 C61.1 J1.1 J2.1 J12.2 J13.2 U1.F5 | length 658.6
  Top Layer w9: 1773.62,1081.38 U1.F5@1773.62,1090.63
  Top Layer w10: v1(3114.5,860) C29.1@3114.5,899.75 3129.75,915 J2.1@3210,915
  Top Layer w15: 1773.62,1081.38 1790,1065 v1(1835,1065)
  Top Layer w20: v1(1200.05,1944.92) 1200.05,1919.64 1217.41,1902.29 1234.76,1919.64 v1(1234.76,1944.92) ; J1.1@2675,1910 2675,1841.92 2691.83,1825.09 C1.1@2691.83,1816.59 2731.39,1816.59 v1(2731.93,1817.12)
  Bottom Layer w15: v1(992.36,1739.65) 1017.65,1739.65 1035,1757 1017.65,1774.35 v1(992.36,1774.35) ; v1(992.36,1827.65) 1017.65,1827.65 1035,1845 1017.65,1862.35 v1(992.36,1862.35)
  other v1: 1913.75,1091 1944,1091 1974.25,1091
UCA0CLK: R53.2 R61.1 U28.36 | length 1544.2
  Top Layer w6: v1(1459.11,370.83) 1756.44,370.83 1782.8,397.2 1956.06,397.2 v1(2009.03,450.17) ; v1(1859,879) 1891.79,911.79 R53.2@1946.07,911.79
  Bottom Layer w6: U28.36@1414.76,361.42 1449.7,361.42 v1(1459.11,370.83) ; v1(1859,879) 1859,881.73 R61.1@1827.89,912.83 1855.86,940.79 2025.94,940.79 2096.57,870.17 2096.57,537.7 v1(2009.03,450.17)
UCA0SIMO: R49.2 R57.2 U28.40 | length 1523.1
  Top Layer w6: v1(1774.45,241.43) 1859.26,241.43 v1(1905.07,287.24) ; R49.2@2042.58,914.54 2130.71,914.54 2214.57,830.68 v1(2214.57,799.4)
  Bottom Layer w6: U28.40@1408.86,282.68 1438.84,282.68 1465.92,255.6 1760.29,255.6 v1(1774.45,241.43) ; v1(1905.07,287.24) 2147.5,529.68 2147.5,564.47 2173.5,590.47 2173.5,650.93 2120,704.43 2120,771.03 2148.37,799.4 v1(2214.57,799.4) R57.2@2214.57,770.02
UCA0SOMI: R51.2 R59.2 U28.41 | length 1984.6
  Top Layer w6: v1(1337.01,145.26) 1337.01,83.95 1373.96,47 1749.76,47 v1(1990,287.24) ; v1(1970.9,910) 1973.47,912.57 R51.2@1995.05,912.57 2011.44,912.57 2029.49,930.63 2145.26,930.63 2145.64,931 v1(2255,821.64)
  Bottom Layer w6: v1(1337.01,145.26) 1337.01,210.83 U28.41@1337.01,182.99 ; R59.2@1892.29,912.83 1968.07,912.83 v1(1970.9,910) ; v1(1990,287.24) 2255,552.24 v1(2255,821.64)
UCA0STE: R47.2 R56.2 U28.39 | length 1357.4
  Top Layer w6: v1(1773.33,286.1) 1773.53,286.3 v1(1865.55,286.3) ; R47.2@2115.99,884 2137.85,884 2183.37,838.48 v1(2183.37,770.02)
  Bottom Layer w6: U28.39@1408.86,302.36 1440.33,302.36 1470.84,271.85 1759.08,271.85 v1(1773.33,286.1) ; v1(1865.55,286.3) 1886.85,265 1909.69,265 2159.5,514.81 2159.5,559.5 2185.5,585.5 2185.5,656.14 2134.88,706.76 2134.88,745.62 R56.2@2159.27,770.02 v1(2183.37,770.02)
UCA1RXD: R103.1 U28.52 | length 565.1
  Top Layer w6: v1(1072.33,154.86) 1124.46,207 v1(1485,207)
  Bottom Layer w6: v1(1072.33,154.86) 1102.34,154.86 1120.47,172.99 U28.52@1120.47,210.83 ; v1(1485,207) 1518.48,207 R103.1@1521.21,209.73
UCA1TXD: R102.1 U28.51 | length 741.7
  Top Layer w6: v1(1100,135) 1149,184 1683.25,184 v1(1694.76,195.51)
  Bottom Layer w6: v1@1100,135.64 1100.09,135.64 1140.16,175.71 U28.51@1140.16,210.83 ; v1(1694.76,195.51) R102.1@1694.76,225.54
UCB1SCL: R37.2 R58.1 U28.47 | length 1470.6
  Top Layer w6: v8(2065.08,654.52) 2065.08,657.81 2064.91,657.98 R37.2@2085.72,678.79
  Bottom Layer w6: U28.47@1218.9,210.83 U28.47@1218.9,204.92 1218.9,148.96 1317.85,50 1782.18,50 1831.03,98.85 1831.03,308.6 1971.43,449 1980.8,449 2065.08,533.28 v8(2065.08,654.52) 2055.07,654.52 R58.1@2030.79,678.79
UCB1SDA: R40.1 R60.1 U28.46 | length 1169.8
  Top Layer w6: v1(1238.58,159.09) 1267.09,159.09 1276,168 1711.41,168 1753,209.59 1753,301 v1(1817,365) ; v1(1917.77,629.88) R40.1@1942.01,629.88
  Bottom Layer w6: v1(1238.58,159.09) U28.46@1238.58,210.83 ; v1(1817,365) 1866,365 1936,435 1936,533.14 1888.31,580.83 R60.1@1887.08,580.83 1917.77,611.51 v1(1917.77,629.88)
USBPG: R19.2 U18.19 | length 99.1
  Bottom Layer w10: R19.2@217.4,1849.06 267.25,1849.06 289.05,1827.26 U18.19@307.47,1827.26
VBUS: C16.1 C17.2 C40.2 C41.1 D1.1 J3.3 R15.1 U18.20 U26.6 U28.65 | length 3265
  Top Layer w15: v1(337.08,1322.92) 337.08,1363.93 399.14,1425.99 465.99,1425.99 J3.3@510,1470 495.44,1484.56 470.05,1484.56 v1(437.4,1517.22)
  Top Layer w20: v1(320.19,1935) v1(320.19,1901.38) 248.68,1901.38 151.65,1804.35 122.15,1804.35 89.61,1771.8 89.61,1633.89 195.5,1528 195.5,1417.42 D1.1@290,1322.92 v1(337.08,1322.92) 355,1305 355,1170 413.93,1111.07 629.6,1111.07 v5(643.33,1097.34) 777.68,963 777.68,858.32 1054.5,581.5 1054.5,437.73 966.77,350 850.11,350 v1(838.69,361.42)
  Bottom Layer w7.87: U26.6@613.19,1039.69 613.19,1051.37
  Bottom Layer w10: U18.20@342.9,1843.01 342.87,1867.87 350,1875 C17.2@350,1901.38 ; v1(838.69,361.42) U28.65@885.24,361.42 U28.65@891.14,361.42
  Bottom Layer w11: 613.19,1051.37 613.19,1067.2 v5(643.33,1097.34)
  Bottom Layer w20: C41.1@245,1327.62 C40.2@290,1327.62 332.38,1327.62 v1(337.08,1322.92) ; v1(320.19,1935) 284.5,1935 276.91,1927.4 276.91,1908.98 284.5,1901.38 v1(320.19,1901.38) C17.2@350,1901.38 ; v1(437.4,1517.22) R15.1@437.4,1550.81
VBUS_IN: D1.2 J10.1 | length 133.8
  Top Layer w15: J10.1@162.4,1178.98 208.98,1178.98
  Top Layer w20: 208.98,1178.98 228.98,1178.98 243.98,1193.98 D1.2@290,1193.98
VCC_BAT: C52.1 C57.1 J3.2 J17.3 L6.1 LED3.1 R106.2 R107.1 R124.1 | length 183.7
  Top Layer w20: v1(680,1536.31) C52.1@680,1573.5 R106.2@750,1573.5 ; v1(898.74,1538.74) LED3.1@937.01,1538.74
  Bottom Layer w20: v1(898.74,1538.74) R124.1@937.01,1538.74
  other v5: 720.02,1505.23
VSUP: C71.1 R124.2 U31.5 U31.8 | length 180.4
  Top Layer w20: v1(978.67,1305.86) 978.67,1342.4 v1(1045.28,1409.01)
  Bottom Layer w15: v1(978.67,1305.86) U31.5@1028.32,1305.86
VUSB: R82.1 U28.66 | length 556
  Top Layer w20: v1(778.51,650.83) 916.81,650.83 1005,562.64 1005,442.51 v1(943.59,381.1)
  Bottom Layer w10: U28.66@891.14,381.1 v1(943.59,381.1)
  Bottom Layer w20: R82.1@744.76,650.68 v1@778.35,650.68
XIN: C44.1 U28.12 Y1.2 | length 219.3
  Bottom Layer w6: C44.1@1142.13,930.68 1140.16,928.71 Y1.2@1140.16,850.68 1140.16,834.84 1179.53,795.47 U28.12@1179.53,728.54
XOUT: C45.1 U28.13 Y1.1 | length 218.4
  Bottom Layer w6: U28.13@1199.21,728.54 1199.21,795.23 1238.58,834.6 Y1.1@1238.58,850.68 C45.1@1238.58,930.68
XT2IN: C46.2 U28.69 Y2.1 | length 357
  Bottom Layer w6: C46.2@606.14,427.05 606.14,398.76 638.17,366.73 Y2.1@668.9,366.73 742.32,440.16 U28.69@891.14,440.16
XT2OUT: C48.1 U28.70 Y2.3 | length 250.9
  Bottom Layer w6: C48.1@744.76,605.68 763.39,587.05 Y2.3@763.39,524.21 763.39,511.76 815.3,459.84 U28.70@891.14,459.84
pads on no net: D2.1S D2.2S D3.1S D3.2S D4.1S D4.2S D5.1S D5.2S D6.1S D6.2S D7.1S D7.2S D8.1S D8.2S D9.1S D9.2S D10.1S D10.2S D11.1S D11.2S D12.1S D12.2S D13.1S D13.2S D14.1S D14.2S D15.1S D15.2S D16.1S D16.2S D17.1S D17.2S D18.1S D18.2S D19.1S D19.2S D20.1S D20.2S FID1.1 FID2.1 FID3.1 FID4.1 FID5.1 FID6.1 J10.4 LBL1.0 P1.2 P1.6 P1.MH1 P1.MH2 P1.MH3 P1.MH4 P1.MH5 P1.MH6 P1.MH7 SH-8.0 SH-J3.0 SH-J5.0 SH-J7.0 SH-J11.0 SH-J12.0 SH-J13.0 SH-J14.0 SH-J15.0 SH-J16.0 SH-J17.0 U18.21@350.38,1717.03 U18.21@350.38,1758.37 U18.21@350.38,1799.7 U18.21@394.47,1717.03 U18.21@394.47,1758.37 U18.21@394.47,1799.7 U26.1 U26.4 U27.1 U28.1 U28.2 U28.3 U28.4 U28.5 U28.6 U28.7 U28.8 U28.15 U28.16 U28.17 U28.27 U28.28 U28.33 U28.34 U28.35 U28.42 U28.43 U28.44 U28.45 U28.48 U28.53 U28.54 U28.55 U28.56 U28.57 U28.58 U28.59 U28.60 U28.67 U28.77 U28.78 U28.79 U28.80 U31.3 U31.7
copper on no net: | length 0.4
  Bottom Layer w6: 891.14,400.79 891.46,401.1

## Polygon pours and split planes (outlines as drawn)
GND on Top Layer "TOP_LAYER_GND_P138" (solid, remove dead copper, pour order 138): 0,0 3286,0 3286,2000 0,2000
TX_SUP on Top Layer "TOP_LAYER_TX_SUP_P040" (solid, remove dead copper, pour order 40): 1900,1139 1900,1081.14 1904.46,1076.68 1981.19,1076.68 1995,1090.49 1995,1139
VCC_BAT on Top Layer "TOP_LAYER_VCC_BAT_P048" (solid, remove dead copper, pour order 48): 1842.99,1614.95 1842.99,1723.86 1852.68,1734.25 1852.68,1854.95 1839.85,1867.77 1782.48,1867.77 1762.86,1848.16 1762.86,1673.08 1283.41,1673.08 1230.12,1619.79 1230.12,1537.27 1000.01,1537.27 960.71,1576.57 885,1576.57 826.81,1518.39 812.71,1518.39 785.2,1545.9 785.2,1609.41 716.81,1609.41 646.33,1609.41 638.07,1601.14 635.4,1600.73 635.4,1456.81 721.89,1370.32 1495.97,1370.32 1560.72,1435.06 1701.45,1435.06 1722.27,1435.06 1755.06,1467.85 1755.06,1527.02
IO_SUP on Top Layer "TOP_LAYER_IO_SUP_P046" (solid, remove dead copper, pour order 46): 1254.6,1759.3 1254.6,1711.06 1242.2,1698.66 1237.24,1693.7 1211.6,1693.7 1203.06,1685.15 1203.06,1679.36 1203.06,1668.89 1182.66,1648.49 1151.38,1648.49 1143.69,1656.19 1143.69,1707.98 1173.87,1738.16 1173.87,1752.8 1180.65,1759.57 1253.77,1759.57
VCC_BAT on Top Layer "TOP_LAYER_VCC_BAT_P044" (solid, remove dead copper, pour order 44): 1758.6,1644.23 1772.86,1629.97 1804.84,1629.97 1852.68,1677.81 1852.68,1799.46 1863.09,1809.87 1932.48,1809.87 1954.38,1831.78 1954.38,1920.6 1919.61,1955.38 1848.95,1955.38 1820.01,1926.44 1820.01,1881.16 1806.15,1867.31 1777.61,1867.31 1758.52,1848.22
TX_SUP on Top Layer "TOP_LAYER_TX_SUP_P042" (solid, remove dead copper, pour order 42): 959.87,1963 959.87,1745.46 987.42,1717.91 1072.71,1717.91 1120.45,1765.65 1120.46,1839.91 1135.94,1855.39 1395.51,1855.39 1404.77,1864.65 1404.77,1949.27 1369.43,1984.61 1332.72,1984.61 981.48,1984.61
GND on Bottom Layer "BOTTOM_LAYER_GND_P150" (solid, remove dead copper, pour order 150): 0,0 3300,0 3300,2000 0,2000
TX_SUP on Bottom Layer "BOTTOM_LAYER_TX_SUP_P148" (solid, remove dead copper, pour order 148): 1853.53,1101.33 1826,1073.81 1826,1065.44 1832.44,1059 1857,1059 1876.5,1078.5 2044,1078.5 2078,1112.5 2078,1169.37 1972.3,1169.37 1951,1148.07 1951,1114.7 1937.64,1101.33
NetL6_2 on Bottom Layer "BOTTOM_LAYER_NETL6_2_P144" (solid, remove dead copper, pour order 144): 1626.33,1797.01 1714.99,1797.01 1733,1779 1733,1712 1718,1697 1692,1697 1684,1705 1652.41,1705 1644.68,1697.27 1624.3,1697.27 1611.55,1710.03 1611.55,1782.23
no net on Bottom Layer "BOTTOM_LAYER_NONET_P082" (solid, remove dead copper, pour order 82): 1699.15,1103.13 1697.36,1101.33 1697.36,1067 1723.48,1067 1727.22,1070.74 1727.22,1111.25 1725.47,1113 1727.47,1115 1737.39,1115 1737.39,1127.92 1736,1129.3 1728.82,1122.13 1708.87,1122.13 1701,1114.26
VSUP on Bottom Layer "BOTTOM_LAYER_VSUP_P058" (solid, remove dead copper, pour order 58): 973,1559 972.73,1397.27 994,1376 997,1373 1055,1373 1057,1373 1064,1380 1064,1417.53 1048.87,1432.66 1048.87,1537.33 1018.21,1568 982,1568
MSP_DVCC on Bottom Layer "BOTTOM_LAYER_MSP_DVCC_P056" (solid, remove dead copper, pour order 56): 1172,1506 1172,1443.74 1152,1423.74 1152,1386 1165,1373 1404,1373 1413,1382 1413,1421 1396,1438 1287,1438 1266.96,1458.04 1266.96,1498.04 1250,1515 1181,1515
NetC68_1 on Bottom Layer "BOTTOM_LAYER_NETC68_1_P054" (solid, remove dead copper, pour order 54): 1361.25,1359 1361.25,1314.36 1384.56,1291.05 1384.56,1221.38 1394.94,1211 1534.82,1211 1539.66,1215.84 1539.66,1345.47 1526.13,1359
MSP_AVCC on Bottom Layer "BOTTOM_LAYER_MSP_AVCC_P052" (solid, remove dead copper, pour order 52): 1424.94,1446.54 1424.94,1382.21 1434.66,1372.49 1531.11,1372.49 1557.82,1345.77 1557.82,1230.92 1568.74,1220 1623.85,1220 1632.94,1229.08 1632.94,1422.73 1602.66,1453.01 1431.32,1453.01 1425.65,1447.33
GND on GND1 "GND1_GND_P086" (solid, remove dead copper, pour order 86): 0,0 3310,0 3310,2000 0,2000
GND on PWR SPLIT PLANE "PWR_SPLIT_PLANE_GND_P142" (solid, remove dead copper, pour order 142): 1880.76,1237.42 1789.48,1146.14 1781.99,1153.62 1726.38,1153.62 1726.38,1154.3 1713.24,1167.44 1713.85,1168.06 1713.85,1229.52 1940.72,1456.39 2170.39,1456.39 2183,1469 2696,1469 2878,1287 2878,1155.07 2817.21,1094.28 2666,1094.28 2522.86,1237.42
no net on PWR SPLIT PLANE "PWR_SPLIT_PLANE_NONET_P140" (solid, remove dead copper, pour order 140): 1783.85,1064.81
MSP_DVCC on PWR SPLIT PLANE "PWR_SPLIT_PLANE_MSP_DVCC_P122" (solid, remove dead copper, pour order 122): -1,1 3300,1 3300,2001 -1,2001
IO_SUP on PWR SPLIT PLANE "PWR_SPLIT_PLANE_IO_SUP_P104" (solid, remove dead copper, pour order 104): 1582.19,1121.06 1582.19,1157.82 1570.46,1169.55 1543.85,1169.55 1513.48,1199.92 1513.48,1380.93 1554.55,1422 1709,1422 1720.72,1432 1720.72,1515.55 1788.68,1583.51 1788.68,1643.3 1762,1668.27 1302.05,1668.28 1264.22,1630.45 1264.22,1540.33 1099.36,1540.33 1099.36,1740.33 1122.84,1763.81 1254.73,1763.81 1289.16,1729.38 1490.83,1729.38 1604.89,1843.44 1737.22,1843.44 1787.41,1793.26 1816.85,1763.81 2224.94,1763.81 2242.78,1745.97 2242.78,1534 2168.31,1459.52 1918.71,1459.52 1698.05,1238.85 1698.05,1156.39 1831.44,1023 1915,1023 2062.6,875.4 2062.6,623.62 1925.3,486.33 1738.27,486.33 1698.04,526.55 1698.04,634.33 1738.06,674.34 1738.06,708.66 1700.86,745.85 1478.75,745.85 1440.93,783.66 1440.93,1052.17 1513.3,1052.17
RX_SUP on PWR SPLIT PLANE "PWR_SPLIT_PLANE_RX_SUP_P102" (solid, remove dead copper, pour order 102): 1692.02,1428 1539.41,1428 1507,1395.59 1507,1198 1542.85,1162.15 1561.84,1162.15 1576.13,1147.86 1576.13,1083.13 1545.99,1053 1544.7,1054.3 1323.26,1054.3 1262.56,1114.99 1262.56,1631.57 1299.11,1668.12 1632.57,1668.11 1753.69,1668.11 1782.17,1640.18 1782.17,1544.49 1770.66,1532.64 1739.78,1532.64 1718.92,1511.78 1718.92,1454.91
VCC_BAT on PWR SPLIT PLANE "PWR_SPLIT_PLANE_VCC_BAT_P100" (solid, remove dead copper, pour order 100): 353.75,1478.76 353.75,1432.02 405.2,1380.57 741.33,1380.57 762.29,1401.53 762.29,1537.19 739.91,1559.57 634.07,1559.57 564.91,1490.41 365.4,1490.41
TX_SUP on PWR SPLIT PLANE "PWR_SPLIT_PLANE_TX_SUP_P098" (solid, remove dead copper, pour order 98): 2539.95,1143.05 2599.3,1083.7 2838.59,1083.7 2908.84,1153.96 2908.84,1268.52 2678.13,1499.23 2316.7,1499.23 2242.78,1570.78 2242.78,1740.13 2213.96,1768.96 1832.15,1768.96 1766.23,1834.89 1550.36,1834.89 1475.44,1759.97 1306.99,1759.97 1164.12,1902.84 1129.36,1902.84 1077.17,1850.66 1077.17,1671.14 1058.12,1652.09 928.37,1652.09 886.15,1694.31 886.15,1999.68 3279,1996.65 3279,895.01 3276,892.01 3276,824 3266,814 3265,815 3107.3,815 3107.3,819.7 3031.49,895.51 3003.19,895.01 2077.99,895.01 1933.3,1039.7 1835.9,1039.7 1823.51,1052.09 1823.51,1082.18 1884.39,1143.05 1951.8,1143.05

## Keep-outs
Keep-Out Layer:
  circle w1: c430,450 r26
  circle w1: c130,490 r26
  circle w1: c430,530 r26
  circle w1: c130,590 r55
  circle w1: c130,390 r55
  circle w1: c355,390 r55
  circle w1: c355,590 r55
  text ".Layer_Name" at 577,-858.49 h60